# Altium PCB Kasli-DIOT.PCBDOC (part 19 of 23)
Units mm, origin at the board's own origin, x right, y up, seen from the top; angles counter-clockwise.
Board outline 222.9 x 100 mm, 10 copper layers (TopLayer, Layer 2, Layer 3, Layer 4, Layer 5, Layer 6, Layer 7, layer 8, Layer 9, BottomLayer), stack 1.564 mm thick; 977 components, 900 nets, 4676 pads, 2725 vias.
Unrouted connection lines stored in the file: 17.
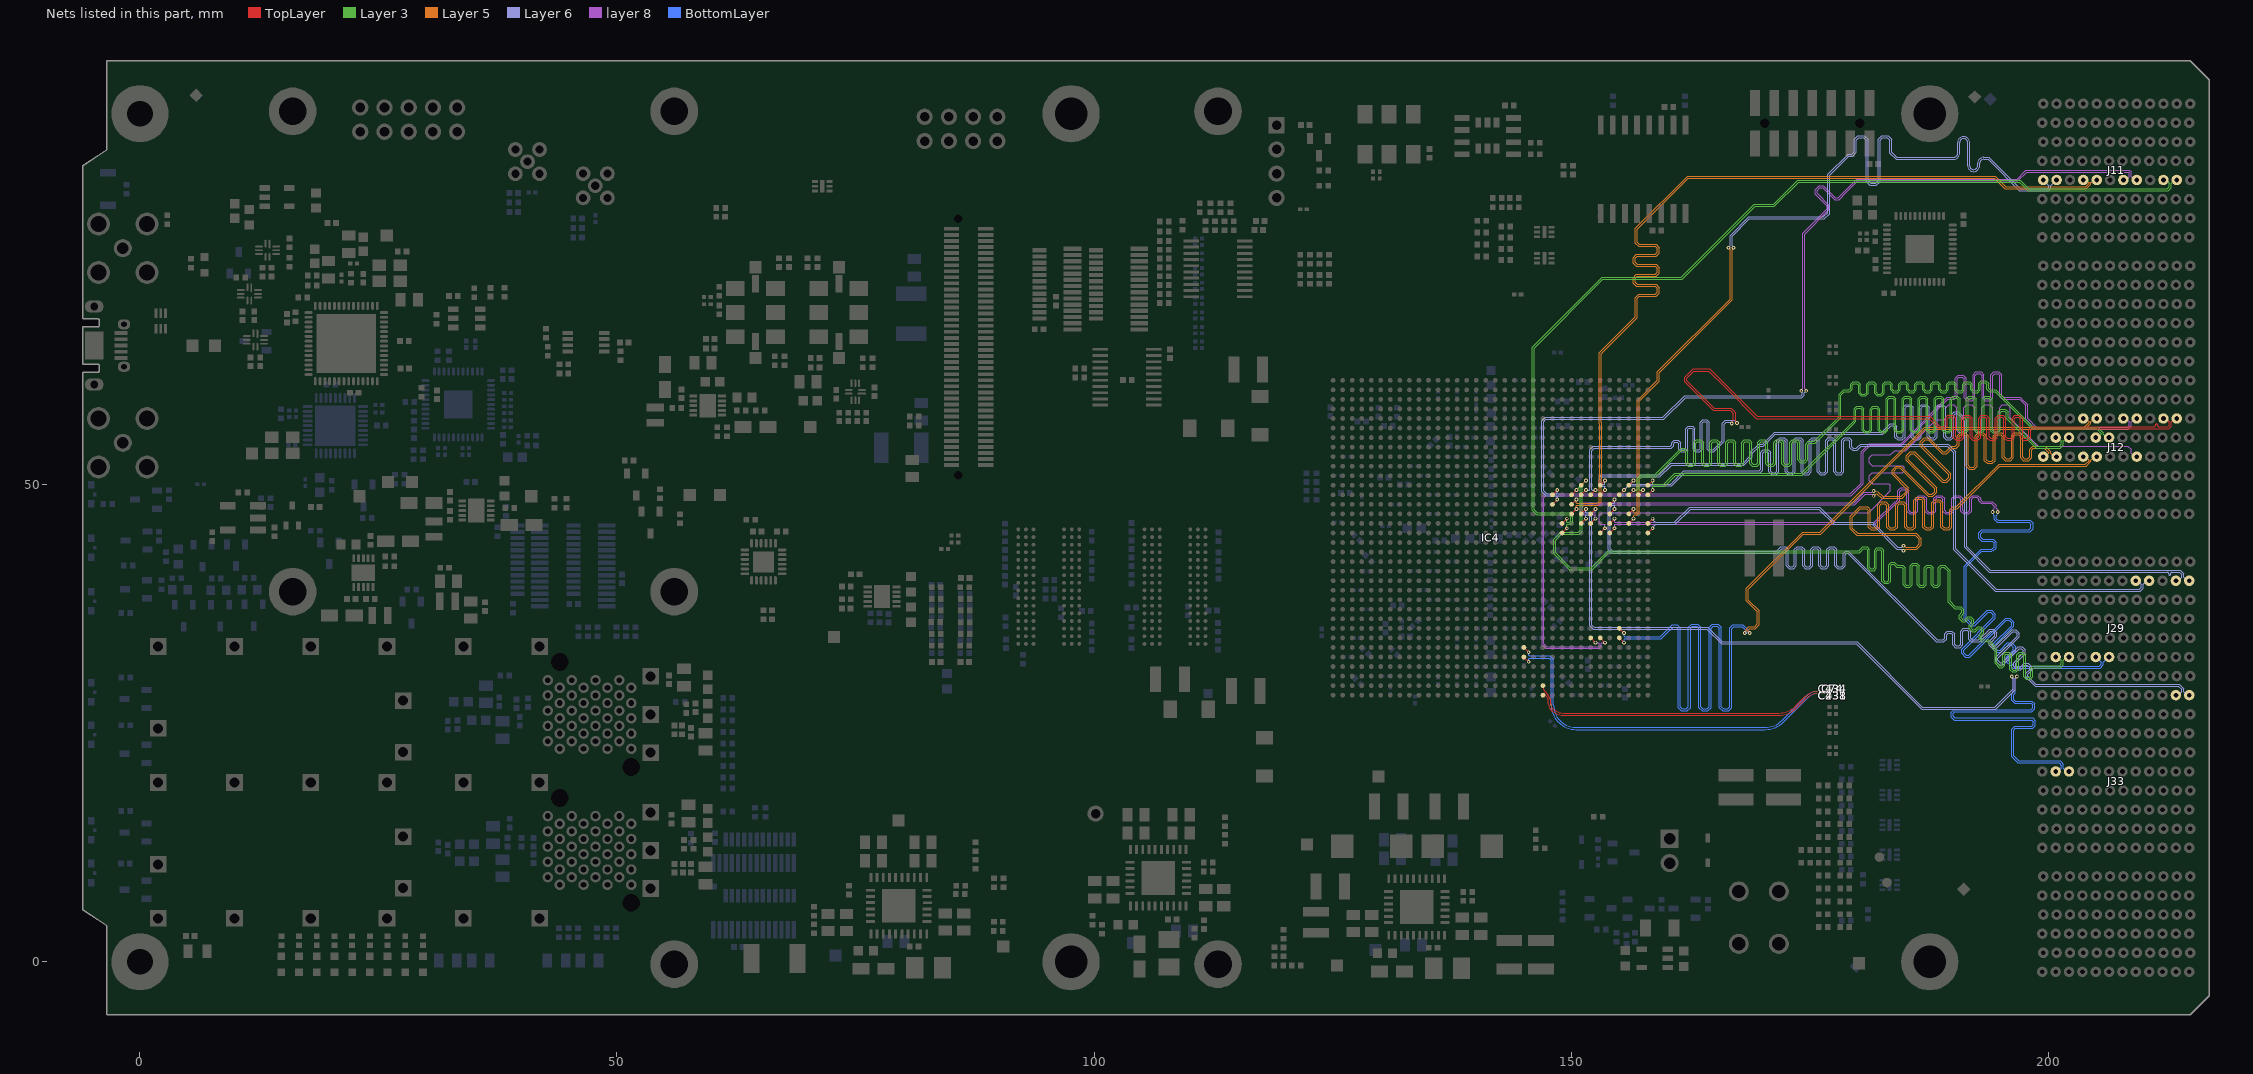
[diagram p25: the nets of this part, all layers, seen from the top]

## Via types
v1: diameter 0.4, hole 0.2, TopLayer to BottomLayer, tented both sides, 1723 vias
v2: diameter 0.5, hole 0.2, TopLayer to BottomLayer, tented both sides, 524 vias
v3: diameter 0.6, hole 0.3, TopLayer to BottomLayer, tented both sides, 172 vias
v4: diameter 0.6, hole 0.3, TopLayer to BottomLayer, 113 vias
v5: diameter 0.5, hole 0.2, TopLayer to BottomLayer, 107 vias
v6: diameter 0.4, hole 0.2, TopLayer to BottomLayer, 67 vias
v7: diameter 0.5, hole 0.25, TopLayer to BottomLayer, tented both sides, 12 vias
v8: diameter 0.8, hole 0.5, TopLayer to BottomLayer, tented both sides, 7 vias

## Nets (pads, with @x,y where several pads share a name; then routed paths per layer and width w, separated by ;. In a path a pad name is that pad's centre, name@x,y a point inside that pad or via, vN(x,y) a via of type N, cw(c..) or ccw(c..) an arc to the next point about the centre after c; other vN are vias at no path point) (continued)
SLOT4.LVDS_8_P: IC4.U29 J12.E4 | length 95.7
  TopLayer w0.095: IC4.U29@153.061,44.95 v1(153.561,45.45)
  layer 8 w0.075: v1(153.561,45.45) 153.561,45.805 153.517,45.849 153.123,45.849 152.961,46.011 152.961,46.808 153.226,47.073 181.198,47.073 183.477,49.351 183.477,49.843 183.477,49.94 183.292,50.124 181.571,50.124 181.269,50.427 181.269,50.963 181.571,51.265 184.758,51.265 184.943,51.45 184.943,51.818 184.758,52.002 181.571,52.002 181.269,52.305 181.269,52.841 181.571,53.143 183.473,53.143 183.755,53.425 183.921,53.592 185.066,53.592 188.296,56.822 189.003,56.822 189.1,56.822 189.284,57.006 189.284,58.07 189.587,58.373 190.122,58.373 190.425,58.07 190.425,55.713 190.609,55.529 190.978,55.529 191.162,55.713 191.162,58.07 191.465,58.373 192,58.373 192.303,58.07 192.303,55.713 192.487,55.529 192.856,55.529 193.04,55.713 193.04,58.07 193.343,58.373 193.878,58.373 194.181,58.07 194.181,55.713 194.365,55.529 194.734,55.529 194.918,55.713 194.918,58.07 195.221,58.373 195.756,58.373 196.059,58.07 196.059,56.98 197.511,55.528 198.981,54.057 208.365,54.057 208.701,53.721 208.701,53.311 209.062,52.95 J12.E4@209.3,52.95
SLOT4.LVDS_9_N: IC4.T34 J12.I4 | length 94.1
  TopLayer w0.095: IC4.T34@158.061,45.95 v1(158.561,46.45)
  Layer 5 w0.08: v1(184.861,43.61) 184.901,43.61 185.061,43.45 186.168,43.45 186.519,43.8 186.519,44.286 186.108,44.697 179.948,44.697 179.274,45.371 179.274,46.711 180.245,47.682 180.786,47.682 181.08,47.682 181.387,47.375 181.387,45.66 181.572,45.474 181.943,45.474 182.129,45.66 182.129,47.91 182.435,48.217 182.978,48.217 183.285,47.91 183.285,45.66 183.47,45.474 183.841,45.474 184.027,45.66 184.027,47.91 184.333,48.217 184.876,48.217 185.183,47.91 185.183,45.66 185.368,45.474 185.739,45.474 185.925,45.66 185.925,48.364 186.231,48.671 186.774,48.671 187.081,48.364 187.081,45.66 187.266,45.474 187.637,45.474 187.823,45.66 187.823,48.106 188.129,48.413 188.672,48.413 188.979,48.106 188.979,45.66 189.164,45.474 189.535,45.474 189.721,45.66 189.721,47.375 190.027,47.682 190.214,47.682 190.4,47.682 194.877,52.159 203.922,52.159 204.296,52.533 204.296,52.599 203.945,52.95 J12.I4@203.7,52.95
  Layer 6 w0.08: v1(158.561,46.45) 158.561,46.363 158.742,46.183 158.742,46.176 158.861,46.057 160.839,46.057 162.439,47.657 176.055,47.657 177.655,46.057 181.639,46.057 184.246,43.45 184.654,43.45 184.814,43.61 v1(184.861,43.61)
SLOT4.LVDS_9_P: IC4.U34 J12.H4 | length 94.5
  TopLayer w0.095: IC4.U34@158.061,44.95 v1(158.561,45.45)
  Layer 5 w0.08: v1(184.861,43.083) 184.901,43.083 185.061,43.243 186.254,43.243 186.726,43.715 186.726,44.371 186.193,44.904 180.034,44.904 179.481,45.457 179.481,46.625 180.33,47.475 180.786,47.475 180.994,47.475 181.18,47.29 181.18,45.574 181.486,45.267 182.029,45.267 182.336,45.574 182.336,47.825 182.521,48.01 182.892,48.01 183.078,47.825 183.078,45.574 183.384,45.267 183.927,45.267 184.234,45.574 184.234,47.825 184.419,48.01 184.79,48.01 184.976,47.825 184.976,45.574 185.282,45.267 185.825,45.267 186.132,45.574 186.132,48.278 186.317,48.464 186.688,48.464 186.874,48.278 186.874,45.574 187.18,45.267 187.723,45.267 188.03,45.574 188.03,48.02 188.215,48.206 188.586,48.206 188.772,48.02 188.772,45.574 189.078,45.267 189.621,45.267 189.928,45.574 189.928,47.29 190.113,47.475 190.214,47.475 190.486,47.475 194.963,51.952 204.008,51.952 204.503,52.447 204.503,52.599 204.854,52.95 J12.H4@205.1,52.95
  Layer 6 w0.08: v1(158.561,45.45) 158.561,45.537 158.742,45.717 158.742,45.731 158.861,45.85 160.925,45.85 162.525,47.45 175.969,47.45 177.569,45.85 181.554,45.85 184.161,43.243 184.654,43.243 184.814,43.083 v1(184.861,43.083)
SLOT4.LVDS_10_N: IC4.R28 J12.L4 | length 99.9
  TopLayer w0.095: IC4.R28@152.061,46.95 v1(152.561,47.45)
  Layer 5 w0.08: v1(181.724,48.845) 181.974,49.075 182.04,49.075 182.571,48.597 184.708,48.597 185.208,49.097 185.34,49.229 185.34,49.698 183.869,51.168 183.869,51.466 184.167,51.764 184.465,51.764 187.436,48.792 187.905,48.792 188.324,49.211 188.324,49.681 185.353,52.652 185.353,52.949 185.65,53.247 185.948,53.247 188.919,50.276 189.388,50.276 189.807,50.695 189.807,51.164 186.836,54.135 186.836,54.433 187.134,54.731 187.432,54.731 188.902,53.26 189.371,53.26 189.961,53.85 190.192,53.85 190.379,53.85 190.685,54.157 190.685,55.071 190.871,55.256 191.242,55.256 191.427,55.071 191.427,51.949 191.734,51.642 192.277,51.642 192.583,51.949 192.583,55.071 192.769,55.256 193.14,55.256 193.325,55.071 193.325,52.547 193.632,52.24 194.175,52.24 194.481,52.547 194.481,55.071 194.667,55.256 195.038,55.256 195.223,55.071 195.223,52.845 195.53,52.539 196.073,52.539 196.379,52.845 196.379,55.071 196.565,55.256 196.936,55.256 197.121,55.071 197.121,52.845 197.428,52.539 197.971,52.539 198.277,52.845 198.277,53.665 198.463,53.85 198.669,53.85 199.614,53.85 200.096,53.368 200.096,53.301 199.745,52.95 J12.L4@199.5,52.95
  layer 8 w0.075: v1(152.561,47.45) 152.561,47.095 152.517,47.051 151.325,47.051 151.158,47.218 151.158,47.668 151.39,47.9 179.746,47.9 180.84,48.994 181.518,48.994 181.667,48.845 v1(181.724,48.845)
SLOT4.LVDS_10_P: IC4.T28 J12.K4 | length 100.8
  TopLayer w0.095: IC4.T28@152.061,45.95 v1(152.561,46.45)
  Layer 5 w0.08: v1(181.724,49.345) 182.126,49.282 182.657,48.804 182.723,48.804 184.622,48.804 185.061,49.243 185.133,49.314 185.133,49.612 183.662,51.082 183.662,51.552 184.081,51.971 184.55,51.971 187.521,48.999 187.819,48.999 188.117,49.297 188.117,49.595 185.146,52.566 185.146,53.035 185.565,53.454 186.034,53.454 189.005,50.483 189.303,50.483 189.6,50.781 189.6,51.078 186.629,54.049 186.629,54.519 187.048,54.938 187.517,54.938 188.988,53.467 189.285,53.467 189.815,53.996 189.875,54.057 190.192,54.057 190.293,54.057 190.478,54.243 190.478,55.156 190.785,55.463 191.328,55.463 191.634,55.156 191.634,52.035 191.82,51.849 192.191,51.849 192.376,52.035 192.376,55.156 192.683,55.463 193.226,55.463 193.532,55.156 193.532,52.632 193.718,52.447 194.089,52.447 194.274,52.632 194.274,55.156 194.581,55.463 195.124,55.463 195.43,55.156 195.43,52.931 195.616,52.746 195.987,52.746 196.172,52.931 196.172,55.156 196.479,55.463 197.022,55.463 197.328,55.156 197.328,52.931 197.514,52.746 197.885,52.746 198.07,52.931 198.07,53.75 198.377,54.057 198.669,54.057 199.7,54.057 200.303,53.453 200.303,53.301 200.654,52.95 J12.K4@200.9,52.95
  layer 8 w0.075: v1(152.561,46.45) 152.561,46.805 152.517,46.849 151.241,46.849 150.956,47.134 150.956,47.752 151.306,48.102 179.662,48.102 180.756,49.196 181.518,49.196 181.667,49.345 v1(181.724,49.345)
SLOT4.LVDS_11_N: IC4.T25 J11.C4 | length 99
  TopLayer w0.095: IC4.T25@149.061,45.95 v1(149.561,46.45)
  Layer 3 w0.075: v1(149.561,46.45) 149.561,46.095 149.605,46.051 149.866,46.051 149.995,46.179 149.995,46.601 149.745,46.85 146.391,46.85 146.133,47.108 145.931,47.31 145.931,64.416 153.264,71.75 161.575,71.75 169.213,79.388 171.226,79.388 171.285,79.447 173.767,81.929 197.082,81.929 197.561,81.45 197.961,81.05 212.504,81.05 212.699,81.245 212.699,81.589 212.338,81.95 J11.C4@212.1,81.95
SLOT4.LVDS_11_P: IC4.U25 J11.B4 | length 99.3
  TopLayer w0.095: IC4.U25@149.061,44.95 v1(149.561,45.45)
  Layer 3 w0.075: v1(149.561,45.45) 149.561,45.805 149.605,45.849 149.95,45.849 150.197,46.096 150.197,46.685 149.829,47.052 146.474,47.052 146.133,47.394 146.133,64.333 153.348,71.548 161.659,71.548 169.297,79.186 171.31,79.186 171.369,79.245 173.85,81.727 196.998,81.727 197.347,81.379 197.877,80.848 212.587,80.848 212.901,81.161 212.901,81.589 213.262,81.95 J11.B4@213.5,81.95
SLOT4.LVDS_12_N: IC4.N24 J11.F4 | length 97.3
  TopLayer w0.095: IC4.N24@148.061,48.95 v1(148.561,49.45)
  Layer 6 w0.08: v1(148.561,49.45) 148.561,49.1 148.514,49.054 147.438,49.054 147.135,49.357 147.135,56.624 147.361,56.85 159.711,56.85 162.011,59.15 174.206,59.15 174.468,59.412 174.468,59.63 174.661,59.823 v1(174.661,59.85)
  layer 8 w0.075: v1(174.661,59.85) 174.661,59.894 174.499,60.056 174.499,76.288 176.911,78.7 177.039,78.828 177.039,79.291 175.786,80.543 175.786,80.839 176.082,81.135 176.378,81.135 177.631,79.883 178.094,79.883 178.855,80.644 180.06,81.849 196.842,81.849 196.902,81.908 197.774,82.781 208.452,82.781 208.499,82.734 208.499,82.311 208.138,81.95 J11.F4@207.9,81.95
SLOT4.LVDS_12_P: IC4.P24 J11.E4 | length 98.3
  TopLayer w0.095: IC4.P24@148.061,47.95 v1(148.561,48.45)
  Layer 6 w0.08: v1(148.561,48.45) 148.561,48.8 148.514,48.847 147.353,48.847 146.928,49.271 146.928,56.71 147.275,57.057 159.625,57.057 161.925,59.357 174.12,59.357 174.261,59.498 174.261,59.643 174.134,59.77 v1(174.134,59.85)
  layer 8 w0.075: v1(174.134,59.85) 174.134,59.894 174.296,60.056 174.296,76.371 176.768,78.843 176.837,78.911 176.837,79.207 175.584,80.46 175.584,80.923 175.998,81.337 176.462,81.337 177.714,80.085 178.01,80.085 178.712,80.787 179.976,82.051 196.759,82.051 197.691,82.983 208.536,82.983 208.701,82.818 208.701,82.311 209.062,81.95 J11.E4@209.3,81.95
SLOT4.LVDS_13_N: IC4.P26 J11.I4 | length 97.9
  TopLayer w0.095: IC4.P26@150.061,47.95 v1(150.561,48.45)
  Layer 5 w0.08: v1(150.561,48.45) 150.561,48.1 150.608,48.054 152.765,48.054 152.961,48.25 152.961,50.543 152.954,50.55 152.949,56.42 152.949,60.074 152.954,60.079 152.954,63.811 152.977,63.834 156.754,67.611 156.754,68.188 156.754,69.622 157.086,69.953 158.851,69.953 159.062,70.164 159.062,70.585 158.851,70.795 156.838,70.795 156.506,71.127 156.506,71.72 156.838,72.051 158.851,72.051 159.062,72.262 159.062,72.683 158.851,72.893 156.838,72.893 156.506,73.225 156.506,73.818 156.838,74.149 158.851,74.149 159.062,74.36 159.062,74.781 158.851,74.991 157.086,74.991 156.754,75.323 156.754,75.51 156.754,76.868 162.213,82.326 194.472,82.326 195.565,81.233 203.93,81.233 204.296,81.599 204.296,81.665 204.249,81.712 204.214,81.712 203.976,81.95 J11.I4@203.7,81.95
SLOT4.LVDS_13_P: IC4.R26 J11.H4 | length 98.2
  TopLayer w0.095: IC4.R26@150.061,46.95 v1(150.561,47.45)
  Layer 5 w0.08: v1(150.561,47.45) 150.561,47.8 150.608,47.847 152.85,47.847 153.168,48.164 153.168,50.603 153.161,56.363 cw(c153.496,56.421) 153.161,56.479 153.161,63.725 153.184,63.748 156.961,67.525 156.961,68.188 156.961,69.536 157.171,69.746 158.937,69.746 159.269,70.078 159.269,70.671 158.937,71.002 156.923,71.002 156.713,71.213 156.713,71.634 156.923,71.844 158.937,71.844 159.269,72.176 159.269,72.769 158.937,73.1 156.923,73.1 156.713,73.311 156.713,73.732 156.923,73.942 158.937,73.942 159.269,74.274 159.269,74.867 158.937,75.198 157.171,75.198 156.961,75.409 156.961,75.51 156.961,76.782 162.298,82.119 194.386,82.119 195.479,81.026 204.016,81.026 204.503,81.513 204.503,81.665 204.55,81.712 204.586,81.712 204.824,81.95 J11.H4@205.1,81.95
SLOT4.LVDS_14_N: IC4.R32 J11.L4 | length 94.5
  TopLayer w0.095: IC4.R32@156.061,46.95 v1(156.561,47.45)
  Layer 5 w0.08: v1(156.561,47.45) 156.561,47.1 156.608,47.054 156.854,47.054 156.954,47.153 156.954,58.836 159.054,60.936 159.054,61.843 166.67,69.459 166.67,74.643 166.51,74.803 v1(166.51,74.85)
  Layer 6 w0.08: v1(166.51,74.85) 166.51,74.897 166.67,75.057 166.67,76.127 168.618,78.075 176.461,78.075 176.909,78.523 176.909,82.537 179.034,84.663 179.322,84.663 179.423,84.663 179.684,84.923 179.684,86.212 180.065,86.594 180.758,86.594 181.14,86.212 181.14,81.866 181.4,81.606 181.921,81.606 182.182,81.866 182.182,86.212 182.563,86.594 183.256,86.594 183.638,86.212 183.638,84.833 184.154,84.316 185.775,84.316 189.08,84.316 190.103,84.316 ccw(c190.103,84.737) 190.524,84.737 190.524,85.876 cw(c191.152,85.876) 191.78,85.876 191.78,83.466 ccw(c192.201,83.466) 192.622,83.466 192.622,83.688 cw(c193.25,83.688) 193.25,84.316 193.799,84.316 193.918,84.197 195.288,82.827 197.065,81.05 199.986,81.05 200.096,81.161 200.096,81.354 J11.L4@199.5,81.95
SLOT4.LVDS_14_P: IC4.T32 J11.K4 | length 94.8
  TopLayer w0.095: IC4.T32@156.061,45.95 v1(156.561,46.45)
  Layer 5 w0.08: v1(156.561,46.45) 156.561,46.8 156.608,46.847 156.94,46.847 157.161,47.068 157.161,58.75 159.261,60.85 159.261,61.757 166.877,69.374 166.877,74.643 167.037,74.803 v1(167.037,74.85)
  Layer 6 w0.08: v1(167.037,74.85) 167.037,74.897 166.877,75.057 166.877,76.041 168.704,77.868 176.547,77.868 177.116,78.437 177.116,82.451 179.12,84.456 179.322,84.456 179.509,84.456 179.891,84.837 179.891,86.127 180.151,86.387 180.672,86.387 180.933,86.127 180.933,81.78 181.314,81.399 182.007,81.399 182.389,81.78 182.389,86.127 182.649,86.387 183.17,86.387 183.431,86.127 183.431,84.747 184.068,84.109 185.775,84.109 189.08,84.109 190.103,84.109 ccw(c190.103,84.737) 190.731,84.737 190.731,85.876 cw(c191.152,85.876) 191.573,85.876 191.573,83.466 ccw(c192.201,83.466) 192.829,83.466 192.829,83.688 cw(c193.25,83.688) 193.25,84.109 193.713,84.109 193.918,83.904 196.979,80.843 200.071,80.843 200.303,81.075 200.303,81.354 J11.K4@200.9,81.95
SLOT4.LVDS_15_N: IC4.R27 J33.K5 | length 98.9
  TopLayer w0.095: IC4.R27@151.061,46.95 v1(151.561,47.45)
  Layer 6 w0.08: v1(151.561,47.45) 151.561,47.1 151.608,47.054 151.95,47.054 152.194,46.81 152.194,35.298 152.409,35.083 164.321,35.083 165.875,33.529 179.982,33.529 186.836,26.675 194.437,26.675 196.361,28.599 196.361,29.703 196.201,29.863 v1(196.201,29.922)
  BottomLayer w0.095: v1(196.201,29.922) 196.201,29.867 196.354,29.714 196.354,28.231 196.201,28.078 196.201,27.734 196.201,27.393 196.495,27.099 198.216,27.099 198.38,26.935 198.38,26.606 198.216,26.442 190.154,26.442 189.859,26.148 189.859,25.635 190.154,25.341 198.296,25.341 198.461,25.177 198.461,24.848 198.296,24.684 196.495,24.684 196.201,24.39 196.201,23.306 196.201,21.496 196.845,20.852 201.164,20.852 201.389,20.627 201.389,20.307 201.032,19.95 J33.K5@200.8,19.95
SLOT4.LVDS_15_P: IC4.T27 J33.J5 | length 99.2
  TopLayer w0.095: IC4.T27@151.061,45.95 v1(151.561,46.45)
  Layer 6 w0.08: v1(151.561,46.45) 151.561,46.8 151.608,46.847 151.865,46.847 151.987,46.724 151.987,35.212 152.323,34.876 164.235,34.876 165.789,33.322 179.896,33.322 186.75,26.468 194.523,26.468 196.568,28.513 196.568,29.703 196.728,29.863 v1(196.728,29.922)
  BottomLayer w0.095: v1(196.728,29.922) 196.728,29.867 196.576,29.714 196.576,28.139 196.423,27.987 196.423,27.734 196.423,27.485 196.587,27.321 198.308,27.321 198.602,27.027 198.602,26.514 198.308,26.22 190.246,26.22 190.081,26.056 190.081,25.727 190.246,25.563 198.388,25.563 198.683,25.269 198.683,24.756 198.388,24.462 196.587,24.462 196.423,24.298 196.423,23.306 196.423,21.588 196.937,21.074 201.256,21.074 201.611,20.719 201.611,20.307 201.968,19.95 J33.J5@202.2,19.95
SLOT4_MGT.MGT_Rx_N: C438.2 IC4.AK21 | length 40.3
  TopLayer w0.095: IC4.AK21@145.061,31.95 v1(145.561,31.45)
  BottomLayer w0.095: v1(145.561,31.45) 145.561,31.783 145.617,31.839 147.702,31.839 147.936,31.605 147.936,26.838 ccw(c150.294,26.838) 148.626,25.171 148.691,25.106 ccw(c150.516,26.93) 148.692,25.105 ccw(c150.516,26.93) 150.516,24.35 170.343,24.35 ccw(c170.343,27.109) 172.294,25.158 174.711,27.575 cw(c176.073,26.213) 176.073,28.139 176.802,28.139 cw(c176.802,28.016) 176.889,28.103 cw(c176.841,28.055) 176.909,28.055 ccw(c176.976,28.055) 176.928,28.008 177.043,27.893 ccw(c177.086,27.935) C438.2@177.086,27.875
SLOT4_MGT.MGT_Rx_P: C434.2 IC4.AJ21 | length 40.3
  TopLayer w0.095: IC4.AJ21@145.061,32.95 v1(145.561,32.45)
  BottomLayer w0.095: v1(145.561,32.45) 145.561,32.117 145.617,32.061 147.794,32.061 148.158,31.697 148.158,26.93 ccw(c150.516,26.93) 148.848,25.263 ccw(c150.516,26.93) 150.516,24.572 170.342,24.572 ccw(c170.342,27.112) 172.138,25.316 174.556,27.734 cw(c176.07,26.22) 176.07,28.361 176.802,28.361 ccw(c176.802,28.484) 176.889,28.397 ccw(c176.841,28.445) 176.909,28.445 cw(c176.976,28.445) 176.928,28.492 177.043,28.607 cw(c177.086,28.565) C434.2@177.086,28.625
SLOT4_MGT.MGT_Tx_N: C231.1 IC4.AP23 | length 32.4
  TopLayer w0.095: IC4.AP23@147.061,27.95 ccw(c146.875,28.136) 147.138,28.136 cw(c147.113,28.044) IC4.AP23@147.16,28.127 ; IC4.AP23@147.16,28.127 cw(c147.061,27.95) 147.245,28.035 ccw(c147.53,28.172) 147.306,27.949 147.406,27.848 cw(c147.339,27.781) 147.432,27.802 ccw(c148.061,27.95) 147.608,27.489 cw(c147.541,27.421) 147.636,27.421 147.636,27.039 ccw(c148.547,27.039) 147.903,26.394 147.905,26.392 ccw(c149.206,27.693) 149.206,25.853 149.569,25.853 171.771,25.853 ccw(c171.771,28.612) 173.722,26.661 174.611,27.55 cw(c176.033,26.128) 176.033,28.139 176.802,28.139 cw(c176.802,28.016) 176.889,28.103 cw(c176.841,28.055) 176.909,28.055 ccw(c176.976,28.055) C231.1@176.928,28.008 ; C231.1@176.928,28.008 177.043,27.893 ccw(c177.086,27.935) C231.1@177.086,27.875
SLOT4_MGT.MGT_Tx_P: C74.1 IC4.AN23 | length 32.7
  TopLayer w0.095: IC4.AN23@147.061,28.95 ccw(c148.129,28.95) 147.253,28.339 ccw(c147.33,28.394) 147.28,28.313 cw(c147.061,27.95) 147.445,28.131 ccw(c147.53,28.172) 147.463,28.106 147.563,28.006 cw(c147.339,27.781) 147.648,27.854 ccw(c148.061,27.95) 147.764,27.647 cw(c147.541,27.421) 147.858,27.422 147.858,27.04 ccw(c148.551,27.04) 148.061,26.55 ccw(c149.208,27.697) 149.208,26.075 171.77,26.075 ccw(c171.77,28.615) 173.566,26.819 174.456,27.709 cw(c176.03,26.135) 176.03,28.361 176.802,28.361 ccw(c176.802,28.484) 176.889,28.397 ccw(c176.841,28.445) 176.909,28.445 cw(c176.976,28.445) 176.928,28.492 177.043,28.607 cw(c177.086,28.565) C74.1@177.086,28.625
SLOT5.LVDS_0_N: IC4.T30 J29.H3 | length 115.7
  TopLayer w0.095: IC4.T30@154.061,45.95 v1(154.561,46.45)
  layer 8 w0.075: v1(154.561,46.45) 154.561,46.095 154.605,46.051 181.776,46.051 183.975,48.25 183.989,48.25 184.086,48.25 184.27,48.434 184.27,49.377 184.573,49.68 185.108,49.68 185.411,49.377 185.411,47.326 185.595,47.142 185.964,47.142 186.148,47.326 186.148,48.57 186.451,48.873 186.986,48.873 187.289,48.57 187.289,47.326 187.473,47.142 187.842,47.142 188.026,47.326 188.026,48.57 188.329,48.873 188.864,48.873 189.167,48.57 189.167,47.326 189.351,47.142 189.72,47.142 189.904,47.326 189.904,48.57 190.207,48.873 190.742,48.873 191.045,48.57 191.045,47.326 191.229,47.142 191.598,47.142 191.782,47.326 191.782,48.57 192.085,48.873 192.62,48.873 192.923,48.57 192.923,48.434 193.107,48.25 193.331,48.25 194.145,48.25 194.563,47.832 194.563,47.546 194.736,47.373 194.736,47.161 v1(194.726,47.15)
  BottomLayer w0.095: v1(194.726,47.15) 194.726,47.108 194.741,47.093 194.743,47.093 cw(c194.199,47.15) 194.573,46.751 194.573,46.577 194.573,46.465 194.762,46.276 198.116,46.276 198.436,45.956 198.436,45.394 198.116,45.075 193.152,45.075 192.962,44.885 192.962,44.507 193.152,44.318 194.254,44.318 194.573,43.998 194.573,43.586 194.573,43.372 194.271,43.07 ccw(c194.28,42.523) 194.121,43.047 193.071,43.047 191.422,41.397 191.422,35.989 191.881,35.53 191.961,35.45 192.229,35.45 193.631,36.852 194.082,36.852 194.48,36.454 194.48,36.003 191.155,32.678 191.155,32.411 191.423,32.143 191.691,32.143 195.553,36.005 196.005,36.005 196.402,35.608 196.402,35.156 194.432,33.185 194.432,32.918 194.699,32.65 194.967,32.65 195.75,33.434 196.202,33.434 196.599,33.036 196.599,32.584 195.847,31.832 195.847,31.564 196.18,31.231 196.41,31.001 205.384,31.001 205.589,31.206 205.589,31.394 205.033,31.95 J29.H3@205,31.95
SLOT5.LVDS_0_P: IC4.U30 J29.G3 | length 116.1
  TopLayer w0.095: IC4.U30@154.061,44.95 v1(154.561,45.45)
  layer 8 w0.075: v1(154.561,45.45) 154.561,45.805 154.605,45.849 181.86,45.849 183.989,47.978 184.059,48.048 184.169,48.048 184.472,48.351 184.472,49.294 184.656,49.478 185.025,49.478 185.209,49.294 185.209,47.243 185.512,46.94 186.047,46.94 186.35,47.243 186.35,48.487 186.534,48.671 186.903,48.671 187.087,48.487 187.087,47.243 187.39,46.94 187.925,46.94 188.228,47.243 188.228,48.487 188.412,48.671 188.781,48.671 188.965,48.487 188.965,47.243 189.268,46.94 189.803,46.94 190.106,47.243 190.106,48.487 190.29,48.671 190.659,48.671 190.843,48.487 190.843,47.243 191.146,46.94 191.681,46.94 191.984,47.243 191.984,48.487 192.168,48.671 192.537,48.671 192.721,48.487 192.721,48.351 193.024,48.048 193.331,48.048 194.061,48.048 194.361,47.748 194.361,47.513 194.211,47.363 194.211,47.162 v1(194.199,47.15)
  BottomLayer w0.095: v1(194.199,47.15) 194.199,47.108 194.181,47.089 ccw(c194.726,47.15) 194.351,46.751 194.351,46.577 194.351,46.373 194.67,46.054 198.024,46.054 198.214,45.864 198.214,45.486 198.024,45.297 193.06,45.297 192.74,44.977 192.74,44.415 193.06,44.096 194.162,44.096 194.351,43.906 194.351,43.586 194.351,43.464 194.172,43.284 ccw(c194.28,42.523) 194.091,43.269 192.98,43.269 191.2,41.489 191.2,35.897 191.724,35.373 191.869,35.228 192.321,35.228 193.723,36.63 193.99,36.63 194.258,36.363 194.258,36.095 190.933,32.77 190.933,32.319 191.331,31.921 191.783,31.921 195.645,35.783 195.913,35.783 196.18,35.516 196.18,35.248 194.21,33.277 194.21,32.826 194.607,32.428 195.059,32.428 195.842,33.212 196.11,33.212 196.377,32.944 196.377,32.676 195.625,31.924 195.625,31.472 196.023,31.075 196.318,30.779 205.476,30.779 205.811,31.114 205.811,31.394 206.366,31.95 J29.G3@206.4,31.95
SLOT5.LVDS_1_N: IC4.M27 J29.K3 | length 105.7
  TopLayer w0.095: IC4.M27@151.061,49.95 v1(151.561,50.45)
  Layer 3 w0.075: v1(151.561,50.45) 151.177,50.066 151.177,45.147 150.85,44.82 148.989,44.82 148.378,44.21 148.378,42.858 149.651,41.585 149.917,41.319 152.127,41.319 153.893,43.085 179.475,43.085 180.206,43.085 180.34,43.22 180.34,43.27 180.593,43.523 181.029,43.523 181.281,43.27 181.281,41.339 181.416,41.205 181.684,41.205 181.818,41.339 181.818,43.142 182.071,43.395 182.507,43.395 182.759,43.142 182.759,39.993 182.894,39.859 183.162,39.859 183.296,39.993 183.296,41.62 183.549,41.872 183.906,41.872 184.003,41.776 184.222,41.556 184.469,41.556 184.767,41.556 185.02,41.303 185.02,39.582 185.154,39.448 185.423,39.448 185.557,39.582 185.557,41.528 185.81,41.781 186.245,41.781 186.498,41.528 186.498,39.582 186.632,39.448 186.901,39.448 187.035,39.582 187.035,41.303 187.288,41.556 187.723,41.556 187.976,41.303 187.976,39.582 188.11,39.448 188.379,39.448 188.513,39.582 188.513,41.303 188.766,41.556 188.946,41.556 189.175,41.556 189.73,41.001 189.73,37.777 190.246,37.261 190.314,37.192 190.504,37.192 190.519,37.207 190.876,37.207 191.184,36.899 191.184,36.542 190.881,36.238 190.881,36.048 191.071,35.859 191.261,35.859 191.564,36.162 191.921,36.162 192.229,35.854 192.229,35.497 191.926,35.193 191.926,35.003 192.116,34.814 192.306,34.814 192.609,35.117 192.966,35.117 193.275,34.809 193.275,34.452 192.971,34.148 192.971,33.958 193.161,33.768 193.351,33.768 193.366,33.783 193.723,33.783 193.955,33.551 194.024,33.483 194.486,33.02 194.486,32.821 194.648,32.659 194.648,32.415 cw(c193.911,32.35) 194.648,32.285 194.648,31.363 194.729,31.282 194.961,31.05 195.026,31.05 195.123,31.05 195.257,31.184 195.257,32.172 195.51,32.425 195.946,32.425 196.198,32.172 196.198,30.719 196.332,30.585 196.601,30.585 196.735,30.719 196.735,32.172 196.988,32.425 197.424,32.425 197.676,32.172 197.676,29.941 197.81,29.807 198.079,29.807 198.213,29.941 198.213,30.797 198.466,31.05 199.181,31.05 201.225,31.05 201.399,31.224 201.399,31.589 201.038,31.95 J29.K3@200.8,31.95
SLOT5.LVDS_1_P: IC4.N26 J29.J3 | length 106.1
  TopLayer w0.095: IC4.N26@150.061,48.95 v1(150.561,49.45)
  Layer 3 w0.075: v1(150.561,49.45) 150.869,49.758 150.931,49.758 150.975,49.714 150.975,45.231 150.767,45.022 148.905,45.022 148.176,44.294 148.176,42.774 149.509,41.442 149.833,41.117 152.211,41.117 153.977,42.883 179.475,42.883 180.29,42.883 180.542,43.136 180.542,43.187 180.677,43.321 180.945,43.321 181.079,43.187 181.079,41.255 181.332,41.003 181.768,41.003 182.02,41.255 182.02,43.059 182.155,43.193 182.423,43.193 182.557,43.059 182.557,39.909 182.81,39.657 183.246,39.657 183.498,39.909 183.498,41.536 183.633,41.67 183.822,41.67 184.003,41.49 184.139,41.354 184.469,41.354 184.684,41.354 184.818,41.22 184.818,39.499 185.071,39.246 185.506,39.246 185.759,39.499 185.759,41.445 185.893,41.579 186.162,41.579 186.296,41.445 186.296,39.499 186.549,39.246 186.984,39.246 187.237,39.499 187.237,41.22 187.371,41.354 187.64,41.354 187.774,41.22 187.774,39.499 188.027,39.246 188.462,39.246 188.715,39.499 188.715,41.22 188.849,41.354 188.946,41.354 189.091,41.354 189.528,40.917 189.528,37.693 190.103,37.118 190.171,37.049 190.23,36.99 190.588,36.99 190.603,37.005 190.792,37.005 190.982,36.815 190.982,36.625 190.679,36.322 190.679,35.965 190.987,35.657 191.344,35.657 191.648,35.96 191.838,35.96 192.027,35.77 192.027,35.58 191.724,35.277 191.724,34.92 192.032,34.612 192.389,34.612 192.693,34.915 192.883,34.915 193.073,34.725 193.073,34.535 192.769,34.232 192.769,33.875 193.077,33.566 193.434,33.566 193.449,33.581 193.639,33.581 193.812,33.408 193.881,33.34 194.284,32.936 194.284,32.737 194.446,32.576 194.446,32.405 cw(c193.911,32.35) 194.446,32.295 194.446,31.28 194.877,30.848 195.026,30.848 195.207,30.848 195.459,31.101 195.459,32.088 195.593,32.223 195.862,32.223 195.996,32.088 195.996,30.636 196.249,30.383 196.685,30.383 196.937,30.636 196.937,32.088 197.071,32.223 197.34,32.223 197.474,32.088 197.474,29.858 197.727,29.605 198.163,29.605 198.415,29.858 198.415,30.714 198.549,30.848 199.181,30.848 201.308,30.848 201.601,31.14 201.601,31.589 201.962,31.95 J29.J3@202.2,31.95
SLOT5.LVDS_2_N: IC4.P30 J29.B1 | length 106.4
  TopLayer w0.095: IC4.P30@154.061,47.95 v1(154.561,48.45)
  Layer 6 w0.08: v1(154.561,48.45) 154.561,48.1 154.514,48.054 154.223,48.054 153.928,47.759 153.928,43.19 154.275,42.843 168.635,42.843 171.649,42.843 171.931,43.125 171.931,43.146 172.091,43.306 172.412,43.306 172.573,43.146 172.573,41.507 172.855,41.226 173.347,41.226 173.629,41.507 173.629,43.146 173.789,43.306 174.11,43.306 174.271,43.146 174.271,41.507 174.553,41.226 175.045,41.226 175.327,41.507 175.327,43.146 175.487,43.306 175.808,43.306 175.969,43.146 175.969,41.507 176.251,41.226 176.743,41.226 177.025,41.507 177.025,43.146 177.185,43.306 177.506,43.306 177.667,43.146 177.667,41.507 177.949,41.226 178.441,41.226 178.723,41.507 178.723,42.683 178.883,42.843 178.975,42.843 178.984,42.834 188.289,33.529 188.891,33.529 189.077,33.529 189.359,33.811 189.359,34.282 189.519,34.443 189.84,34.443 190.001,34.282 190.001,33.212 190.283,32.93 190.775,32.93 191.057,33.212 191.057,34.576 191.217,34.737 191.538,34.737 191.699,34.576 191.699,33.811 191.981,33.529 192.307,33.529 192.5,33.529 192.849,33.529 193.972,34.652 194.199,34.652 194.426,34.425 194.426,34.198 193.826,33.597 193.826,33.199 194.174,32.851 194.572,32.851 196.316,34.595 196.543,34.595 196.77,34.368 196.77,34.141 194.54,31.91 194.54,31.512 194.888,31.164 195.287,31.164 196.964,32.841 197.191,32.841 197.418,32.614 197.418,32.387 196.396,31.365 196.396,30.967 196.744,30.619 197.143,30.619 197.615,31.091 197.842,31.091 198.069,30.864 198.069,30.637 197.674,30.242 197.674,29.844 197.78,29.738 197.936,29.582 198.007,29.511 198.637,28.881 213.665,28.881 213.996,28.55 213.996,28.453 213.996,28.301 213.645,27.95 J29.B1@213.4,27.95
SLOT5.LVDS_2_P: IC4.R30 J29.A1 | length 106
  TopLayer w0.095: IC4.R30@154.061,46.95 v1(154.561,47.45)
  Layer 6 w0.08: v1(154.561,47.45) 154.561,47.8 154.514,47.847 154.309,47.847 154.135,47.673 154.135,43.276 154.361,43.05 168.635,43.05 171.563,43.05 171.724,43.21 171.724,43.231 172.006,43.513 172.498,43.513 172.78,43.231 172.78,41.593 172.94,41.433 173.261,41.433 173.422,41.593 173.422,43.231 173.704,43.513 174.196,43.513 174.478,43.231 174.478,41.593 174.638,41.433 174.959,41.433 175.12,41.593 175.12,43.231 175.402,43.513 175.894,43.513 176.176,43.231 176.176,41.593 176.336,41.433 176.657,41.433 176.818,41.593 176.818,43.231 177.1,43.513 177.592,43.513 177.874,43.231 177.874,41.593 178.034,41.433 178.355,41.433 178.516,41.593 178.516,42.768 178.798,43.05 178.984,43.05 179.061,43.05 188.375,33.736 188.891,33.736 188.991,33.736 189.152,33.896 189.152,34.368 189.434,34.65 189.926,34.65 190.208,34.368 190.208,33.297 190.368,33.137 190.689,33.137 190.85,33.297 190.85,34.662 191.132,34.944 191.624,34.944 191.906,34.662 191.906,33.896 192.066,33.736 192.307,33.736 192.707,33.736 192.763,33.736 193.886,34.859 194.285,34.859 194.633,34.51 194.633,34.112 194.033,33.512 194.033,33.285 194.26,33.058 194.487,33.058 196.231,34.802 196.629,34.802 196.977,34.454 196.977,34.055 194.747,31.825 194.747,31.598 194.974,31.371 195.201,31.371 196.878,33.048 197.276,33.048 197.625,32.7 197.625,32.301 196.603,31.28 196.603,31.053 196.83,30.826 197.057,30.826 197.529,31.298 197.928,31.298 198.276,30.949 198.276,30.551 197.881,30.157 197.881,29.93 197.977,29.834 198.082,29.729 198.154,29.657 198.723,29.088 213.751,29.088 214.203,28.636 214.203,28.368 214.203,28.301 214.554,27.95 J29.A1@214.8,27.95
SLOT5.LVDS_3_N: IC4.M29 J29.B7 | length 104.7
  TopLayer w0.095: IC4.M29@153.061,49.95 v1(153.561,50.45)
  Layer 6 w0.08: v1(153.561,50.45) 153.561,50.1 153.514,50.054 153.262,50.054 153.161,50.154 153.161,50.679 153.332,50.85 159.322,50.85 160.536,52.064 168.116,52.064 169.001,52.949 169.001,53.31 169.758,54.067 170.167,54.067 171.425,55.325 182.679,55.325 182.895,55.542 183.57,56.216 183.797,56.216 183.957,56.055 183.957,55.001 184.239,54.72 184.731,54.72 185.013,55.001 185.013,58.05 185.174,58.21 185.495,58.21 185.655,58.05 185.655,55.001 185.937,54.72 186.429,54.72 186.711,55.001 186.711,58.05 186.872,58.21 187.193,58.21 187.353,58.05 187.353,55.001 187.635,54.72 188.127,54.72 188.409,55.001 188.409,58.05 188.57,58.21 188.891,58.21 189.051,58.05 189.051,55.001 189.333,54.72 189.825,54.72 190.107,55.001 190.107,57.299 190.268,57.459 190.495,57.459 190.681,57.273 191.274,56.679 191.274,54.95 191.274,43.43 193.854,40.85 212.245,40.85 212.515,40.85 cw(c212.515,40.735) 212.63,40.735 212.63,40.657 ccw(c212.745,40.657) 212.745,40.542 ccw(c212.745,40.657) 212.86,40.657 212.86,40.735 cw(c212.975,40.735) 212.975,40.85 213.479,40.85 213.754,40.85 213.996,40.608 213.996,40.301 213.645,39.95 J29.B7@213.4,39.95
SLOT5.LVDS_3_P: IC4.N29 J29.A7 | length 105.3
  TopLayer w0.095: IC4.N29@153.061,48.95 v1(153.561,49.45)
  Layer 6 w0.08: v1(153.561,49.45) 153.561,49.8 153.514,49.847 153.176,49.847 152.954,50.068 152.954,50.765 153.246,51.057 159.236,51.057 160.45,52.271 168.03,52.271 168.794,53.035 168.794,53.395 169.672,54.274 170.081,54.274 171.339,55.532 182.593,55.532 182.895,55.834 183.484,56.423 183.882,56.423 184.164,56.141 184.164,55.087 184.325,54.927 184.646,54.927 184.806,55.087 184.806,58.136 185.088,58.417 185.58,58.417 185.862,58.136 185.862,55.087 186.023,54.927 186.344,54.927 186.504,55.087 186.504,58.136 186.786,58.417 187.278,58.417 187.56,58.136 187.56,55.087 187.721,54.927 188.042,54.927 188.202,55.087 188.202,58.136 188.484,58.417 188.976,58.417 189.258,58.136 189.258,55.087 189.419,54.927 189.74,54.927 189.9,55.087 189.9,57.384 190.182,57.666 190.58,57.666 190.681,57.565 191.481,56.765 191.481,54.864 191.481,43.515 193.94,41.057 212.245,41.057 213.84,41.057 214.203,40.694 214.203,40.301 214.555,39.95 J29.A7@214.8,39.95
SLOT5.LVDS_4_N: IC4.M32 J29.E7 | length 104.6
  TopLayer w0.095: IC4.M32@156.061,49.95 v1(156.561,50.45)
  Layer 6 w0.08: v1(156.561,50.45) 156.307,50.196 156.307,50.13 156.354,50.083 160.45,50.083 161.817,51.45 169.628,51.45 169.729,51.45 169.889,51.61 169.889,53.405 170.171,53.687 170.664,53.687 170.945,53.405 170.945,51.428 171.106,51.268 171.427,51.268 171.587,51.428 171.587,54.663 171.869,54.945 172.362,54.945 172.643,54.663 172.643,51.428 172.804,51.268 173.125,51.268 173.285,51.428 173.285,54.663 173.567,54.945 174.06,54.945 174.341,54.663 174.341,51.428 174.502,51.268 174.823,51.268 174.983,51.428 174.983,54.663 175.265,54.945 175.758,54.945 176.039,54.663 176.039,51.428 176.2,51.268 176.521,51.268 176.681,51.428 176.681,54.663 176.963,54.945 177.456,54.945 177.737,54.663 177.737,51.428 177.898,51.268 178.219,51.268 178.379,51.428 178.379,54.663 178.661,54.945 179.154,54.945 179.435,54.663 179.435,53.977 179.596,53.816 179.917,53.816 180.077,53.977 180.077,53.982 180.359,54.264 181.35,54.264 189.52,54.264 190.318,53.465 190.318,43.304 194.572,39.05 209.583,39.05 209.796,39.263 209.796,39.599 209.445,39.95 J29.E7@209.2,39.95
SLOT5.LVDS_4_P: IC4.N31 J29.D7 | length 105.4
  TopLayer w0.095: IC4.N31@155.061,48.95 v1(155.561,49.45)
  Layer 6 w0.08: v1(155.561,49.45) 155.987,49.876 160.536,49.876 161.903,51.243 169.628,51.243 169.815,51.243 170.096,51.525 170.096,53.319 170.257,53.48 170.578,53.48 170.738,53.319 170.738,51.343 171.02,51.061 171.513,51.061 171.794,51.343 171.794,54.577 171.955,54.738 172.276,54.738 172.436,54.577 172.436,51.343 172.718,51.061 173.211,51.061 173.492,51.343 173.492,54.577 173.653,54.738 173.974,54.738 174.134,54.577 174.134,51.343 174.416,51.061 174.909,51.061 175.19,51.343 175.19,54.577 175.351,54.738 175.672,54.738 175.832,54.577 175.832,51.343 176.114,51.061 176.607,51.061 176.888,51.343 176.888,54.577 177.049,54.738 177.37,54.738 177.53,54.577 177.53,51.343 177.812,51.061 178.305,51.061 178.586,51.343 178.586,54.577 178.747,54.738 179.068,54.738 179.228,54.577 179.228,53.891 179.51,53.609 180.003,53.609 180.284,53.891 180.284,53.897 180.445,54.057 181.35,54.057 189.434,54.057 190.111,53.38 190.111,43.218 194.487,38.843 209.669,38.843 210.003,39.177 210.003,39.599 210.354,39.95 J29.D7@210.6,39.95
SLOT5.LVDS_5_N: IC4.N33 J12.H5 | length 107.7
  TopLayer w0.095: IC4.N33@157.061,48.95 v1(157.561,49.45)
  Layer 3 w0.075: v1(157.561,49.45) 157.206,49.45 157.162,49.494 157.162,50.566 157.446,50.85 158.001,50.85 158.003,50.848 158.859,50.848 161.454,53.443 161.637,53.626 161.862,53.626 162.021,53.466 162.021,52.204 162.299,51.927 162.784,51.927 163.062,52.204 163.062,54.362 163.221,54.521 163.54,54.521 163.699,54.362 163.699,52.204 163.977,51.927 164.462,51.927 164.74,52.204 164.74,54.362 164.899,54.521 165.218,54.521 165.377,54.362 165.377,52.204 165.655,51.927 166.14,51.927 166.418,52.204 166.418,54.362 166.577,54.521 166.896,54.521 167.055,54.362 167.055,52.204 167.333,51.927 167.818,51.927 168.096,52.204 168.096,54.362 168.255,54.521 168.574,54.521 168.733,54.362 168.733,52.204 169.011,51.927 169.497,51.927 169.774,52.204 169.774,54.362 169.933,54.521 170.252,54.521 170.411,54.362 170.411,52.204 170.689,51.927 171.175,51.927 171.452,52.204 171.452,54.362 171.611,54.521 171.93,54.521 172.089,54.362 172.089,52.204 172.367,51.927 172.853,51.927 173.13,52.204 173.13,54.362 173.289,54.521 173.608,54.521 173.767,54.362 173.767,52.612 174.045,52.334 174.531,52.334 174.808,52.612 174.808,54.189 174.967,54.348 175.064,54.348 175.597,54.348 178.294,57.045 178.294,59.383 178.664,59.752 179.039,59.752 179.22,59.752 179.497,60.03 179.497,60.459 179.657,60.618 179.975,60.618 180.134,60.459 180.134,59.589 180.412,59.311 180.898,59.311 181.175,59.589 181.175,60.459 181.335,60.618 181.653,60.618 181.812,60.459 181.812,59.593 182.09,59.316 182.576,59.316 182.853,59.593 182.853,60.459 183.013,60.618 183.331,60.618 183.49,60.459 183.49,59.942 183.768,59.664 184.254,59.664 184.531,59.942 184.531,60.459 184.691,60.618 185.009,60.618 185.168,60.459 185.168,59.942 185.446,59.664 185.932,59.664 186.209,59.942 186.209,60.459 186.369,60.618 186.687,60.618 186.846,60.459 186.846,59.942 187.124,59.664 187.61,59.664 187.887,59.942 187.887,60.459 188.047,60.618 188.365,60.618 188.524,60.459 188.524,59.942 188.802,59.664 189.288,59.664 189.565,59.942 189.565,60.459 189.725,60.618 190.043,60.618 190.202,60.459 190.202,59.942 190.48,59.664 190.966,59.664 191.243,59.942 191.243,60.459 191.403,60.618 191.721,60.618 191.88,60.459 191.88,59.942 192.158,59.664 192.644,59.664 192.921,59.942 192.921,60.564 193.081,60.723 193.399,60.723 193.558,60.564 193.558,60.03 193.836,59.752 194.459,59.752 194.835,59.376 198.361,55.85 205.11,55.85 205.599,55.361 205.599,55.299 205.249,54.95 J12.H5@205,54.95
SLOT5.LVDS_5_P: IC4.N32 J12.G5 | length 108.3
  TopLayer w0.095: IC4.N32@156.061,48.95 v1(156.561,49.45)
  Layer 3 w0.075: v1(156.561,49.45) 156.916,49.45 156.96,49.494 156.96,50.65 157.362,51.052 158.085,51.052 158.087,51.05 158.775,51.05 161.454,53.729 161.553,53.828 161.945,53.828 162.223,53.55 162.223,52.288 162.382,52.129 162.701,52.129 162.86,52.288 162.86,54.445 163.138,54.723 163.623,54.723 163.901,54.445 163.901,52.288 164.06,52.129 164.379,52.129 164.538,52.288 164.538,54.445 164.816,54.723 165.301,54.723 165.579,54.445 165.579,52.288 165.738,52.129 166.057,52.129 166.216,52.288 166.216,54.445 166.494,54.723 166.979,54.723 167.257,54.445 167.257,52.288 167.416,52.129 167.735,52.129 167.894,52.288 167.894,54.445 168.172,54.723 168.657,54.723 168.935,54.445 168.935,52.288 169.094,52.129 169.413,52.129 169.572,52.288 169.572,54.445 169.85,54.723 170.336,54.723 170.613,54.445 170.613,52.288 170.772,52.129 171.091,52.129 171.25,52.288 171.25,54.445 171.528,54.723 172.014,54.723 172.291,54.445 172.291,52.288 172.45,52.129 172.769,52.129 172.928,52.288 172.928,54.445 173.206,54.723 173.692,54.723 173.969,54.445 173.969,52.696 174.128,52.536 174.447,52.536 174.606,52.696 174.606,54.272 174.884,54.55 175.064,54.55 175.514,54.55 178.092,57.129 178.092,59.466 178.58,59.954 179.039,59.954 179.136,59.954 179.295,60.113 179.295,60.542 179.573,60.82 180.059,60.82 180.336,60.542 180.336,59.672 180.496,59.513 180.814,59.513 180.973,59.672 180.973,60.542 181.251,60.82 181.737,60.82 182.014,60.542 182.014,59.677 182.174,59.518 182.492,59.518 182.651,59.677 182.651,60.542 182.929,60.82 183.415,60.82 183.692,60.542 183.692,60.025 183.852,59.866 184.17,59.866 184.329,60.025 184.329,60.542 184.607,60.82 185.093,60.82 185.37,60.542 185.37,60.025 185.53,59.866 185.848,59.866 186.007,60.025 186.007,60.542 186.285,60.82 186.771,60.82 187.048,60.542 187.048,60.025 187.208,59.866 187.526,59.866 187.685,60.025 187.685,60.542 187.963,60.82 188.449,60.82 188.726,60.542 188.726,60.025 188.886,59.866 189.204,59.866 189.363,60.025 189.363,60.542 189.641,60.82 190.127,60.82 190.404,60.542 190.404,60.025 190.564,59.866 190.882,59.866 191.041,60.025 191.041,60.542 191.319,60.82 191.805,60.82 192.082,60.542 192.082,60.025 192.242,59.866 192.56,59.866 192.719,60.025 192.719,60.647 192.997,60.925 193.483,60.925 193.76,60.647 193.76,60.113 193.92,59.954 194.543,59.954 194.835,59.662 198.445,56.052 205.194,56.052 205.801,55.445 205.801,55.299 206.15,54.95 J12.G5@206.4,54.95
SLOT5.LVDS_6_N: IC4.M34 J12.K5 | length 107.7
  TopLayer w0.095: IC4.M34@158.061,49.95 v1(158.561,50.45)
  Layer 3 w0.075: v1(158.561,50.45) 158.561,50.095 158.605,50.051 159.719,50.051 160.87,51.203 174.148,51.203 179.627,56.682 179.664,56.719 179.664,57.959 179.942,58.236 180.428,58.236 180.705,57.959 180.705,55.796 180.864,55.637 181.183,55.637 181.342,55.796 181.342,57.935 181.62,58.213 182.106,58.213 182.383,57.935 182.383,55.796 182.542,55.637 182.861,55.637 183.02,55.796 183.02,59.011 183.298,59.289 183.784,59.289 184.061,59.011 184.061,55.796 184.22,55.637 184.539,55.637 184.698,55.796 184.698,59.011 184.976,59.289 185.462,59.289 185.739,59.011 185.739,55.796 185.898,55.637 186.217,55.637 186.376,55.796 186.376,59.011 186.654,59.289 187.14,59.289 187.417,59.011 187.417,55.796 187.576,55.637 187.895,55.637 188.054,55.796 188.054,59.011 188.332,59.289 188.818,59.289 189.095,59.011 189.095,55.796 189.254,55.637 189.573,55.637 189.732,55.796 189.732,59.011 190.01,59.289 190.496,59.289 190.773,59.011 190.773,55.796 190.932,55.637 191.251,55.637 191.41,55.796 191.41,59.011 191.688,59.289 192.174,59.289 192.451,59.011 192.451,55.796 192.61,55.637 192.929,55.637 193.088,55.796 193.088,59.011 193.366,59.289 193.852,59.289 194.129,59.011 194.129,55.796 194.288,55.637 194.607,55.637 194.766,55.796 194.766,57.655 195.044,57.933 195.53,57.933 195.807,57.655 195.807,57.071 196.543,56.335 198.828,54.05 201.219,54.05 201.399,54.23 201.399,54.568 cw(c202.2,54.95) 201.374,54.626 201.049,54.95 J12.K5@200.8,54.95
SLOT5.LVDS_6_P: IC4.N34 J12.J5 | length 108.1
  TopLayer w0.095: IC4.N34@158.061,48.95 v1(158.561,49.45)
  Layer 3 w0.075: v1(158.561,49.45) 158.561,49.805 158.605,49.849 159.802,49.849 160.954,51.001 174.231,51.001 179.627,56.396 179.866,56.636 179.866,57.875 180.025,58.034 180.344,58.034 180.503,57.875 180.503,55.713 180.781,55.435 181.267,55.435 181.544,55.713 181.544,57.851 181.703,58.011 182.022,58.011 182.181,57.851 182.181,55.713 182.459,55.435 182.945,55.435 183.222,55.713 183.222,58.928 183.381,59.087 183.7,59.087 183.859,58.928 183.859,55.713 184.137,55.435 184.623,55.435 184.9,55.713 184.9,58.928 185.059,59.087 185.378,59.087 185.537,58.928 185.537,55.713 185.815,55.435 186.301,55.435 186.578,55.713 186.578,58.928 186.737,59.087 187.056,59.087 187.215,58.928 187.215,55.713 187.493,55.435 187.979,55.435 188.256,55.713 188.256,58.928 188.415,59.087 188.734,59.087 188.893,58.928 188.893,55.713 189.171,55.435 189.657,55.435 189.934,55.713 189.934,58.928 190.093,59.087 190.412,59.087 190.571,58.928 190.571,55.713 190.849,55.435 191.335,55.435 191.612,55.713 191.612,58.928 191.771,59.087 192.09,59.087 192.249,58.928 192.249,55.713 192.527,55.435 193.013,55.435 193.29,55.713 193.29,58.928 193.449,59.087 193.768,59.087 193.927,58.928 193.927,55.713 194.205,55.435 194.691,55.435 194.968,55.713 194.968,57.572 195.127,57.731 195.446,57.731 195.605,57.572 195.605,56.987 196.543,56.049 198.744,53.848 201.303,53.848 201.601,54.146 201.601,54.568 ccw(c200.8,54.95) 201.626,54.626 201.95,54.95 J12.J5@202.2,54.95
SLOT5.LVDS_7_N: IC4.N28 J12.C6 | length 118.4
  TopLayer w0.095: IC4.N28@152.061,48.95 v1(152.561,49.45) ; v1(166.847,56.432) 166.847,56.514 167.025,56.692 167.025,57.45 166.682,57.793 164.928,57.793 164.572,58.149 164.29,58.432 161.914,60.807 161.914,61.265 162.792,62.144 164.548,62.144 166.217,60.475 169.52,57.172 187.646,57.172 188.603,56.215 188.739,56.079 188.925,56.079 189.037,56.079 189.201,56.243 189.201,56.992 189.496,57.287 190.008,57.287 190.302,56.992 190.302,55.035 190.467,54.871 190.795,54.871 190.959,55.035 190.959,56.992 191.254,57.287 191.766,57.287 192.06,56.992 192.06,55.035 192.225,54.871 192.553,54.871 192.717,55.035 192.717,56.992 193.012,57.287 193.524,57.287 193.818,56.992 193.818,55.035 193.983,54.871 194.311,54.871 194.475,55.035 194.475,56.992 194.77,57.287 195.282,57.287 195.576,56.992 195.576,55.035 195.741,54.871 196.069,54.871 196.233,55.035 196.233,56.992 196.528,57.287 197.04,57.287 197.334,56.992 197.334,55.035 197.499,54.871 197.827,54.871 197.991,55.035 197.991,55.784 198.286,56.079 198.761,56.079 211.083,56.079 211.13,56.079 ccw(c211.13,56.201) 211.253,56.201 211.253,56.264 cw(c211.375,56.264) 211.375,56.387 cw(c211.375,56.264) 211.498,56.264 211.498,56.201 ccw(c211.62,56.201) 211.62,56.079 212,56.079 212.553,56.079 212.689,56.215 212.689,56.593 212.332,56.95 J12.C6@212.1,56.95
  Layer 6 w0.08: v1(152.561,49.45) 152.211,49.45 152.165,49.497 152.165,53.573 152.442,53.85 160.304,53.85 160.491,53.85 160.748,54.107 160.748,54.324 160.883,54.46 161.154,54.46 161.29,54.324 161.29,53.709 161.546,53.452 161.989,53.452 162.246,53.709 162.246,55.801 162.381,55.937 162.652,55.937 162.788,55.801 162.788,53.709 163.044,53.452 163.487,53.452 163.744,53.709 163.744,56.484 163.879,56.62 164.15,56.62 164.286,56.484 164.286,53.709 164.542,53.452 164.985,53.452 165.242,53.709 165.242,53.719 165.765,54.242 166.068,54.545 166.068,56.366 166.267,56.565 166.64,56.565 166.773,56.432 v1(166.847,56.432)
SLOT5.LVDS_7_P: IC4.N27 J12.B6 | length 119
  TopLayer w0.095: IC4.N27@151.061,48.95 v1(151.561,49.45) ; v1(167.411,56.477) 167.411,56.514 167.247,56.678 167.247,57.542 166.774,58.015 165.02,58.015 164.886,58.149 162.136,60.899 162.136,61.174 162.884,61.922 164.457,61.922 166.125,60.253 169.428,56.95 187.554,56.95 188.289,56.215 188.446,56.058 188.647,55.857 188.925,55.857 189.129,55.857 189.423,56.151 189.423,56.9 189.588,57.065 189.916,57.065 190.08,56.9 190.08,54.943 190.375,54.649 190.887,54.649 191.181,54.943 191.181,56.9 191.346,57.065 191.674,57.065 191.838,56.9 191.838,54.943 192.133,54.649 192.645,54.649 192.939,54.943 192.939,56.9 193.104,57.065 193.432,57.065 193.596,56.9 193.596,54.943 193.891,54.649 194.403,54.649 194.697,54.943 194.697,56.9 194.862,57.065 195.19,57.065 195.354,56.9 195.354,54.943 195.649,54.649 196.161,54.649 196.455,54.943 196.455,56.9 196.62,57.065 196.948,57.065 197.112,56.9 197.112,54.943 197.407,54.649 197.919,54.649 198.213,54.943 198.213,55.692 198.378,55.857 198.761,55.857 212.645,55.857 212.911,56.123 212.911,56.593 213.268,56.95 J12.B6@213.5,56.95
  Layer 6 w0.08: v1(151.561,49.45) 151.911,49.45 151.958,49.497 151.958,53.658 152.356,54.057 160.304,54.057 160.405,54.057 160.541,54.193 160.541,54.41 160.797,54.667 161.24,54.667 161.497,54.41 161.497,53.795 161.632,53.659 161.903,53.659 162.039,53.795 162.039,55.887 162.295,56.144 162.738,56.144 162.995,55.887 162.995,53.795 163.13,53.659 163.401,53.659 163.537,53.795 163.537,56.57 163.793,56.827 164.236,56.827 164.493,56.57 164.493,53.795 164.628,53.659 164.899,53.659 165.035,53.795 165.035,53.804 165.765,54.534 165.861,54.631 165.861,56.452 166.181,56.772 167.116,56.772 167.406,56.481 v1@167.406,56.477
SLOT5.LVDS_8_N: IC4.AH29 J12.F6 | length 108.7
  TopLayer w0.095: IC4.AH29@153.061,33.95 v1(153.561,33.45)
  layer 8 w0.075: v1(153.561,33.45) 153.206,33.45 153.162,33.406 153.162,33.066 152.944,32.848 147.362,32.848 147.303,32.907 146.959,33.251 146.959,48.734 147.275,49.05 179.287,49.05 180.418,50.181 180.418,53.474 181.268,54.324 184.594,54.324 189.421,59.151 189.983,59.151 190.08,59.151 190.264,59.336 190.264,61.181 190.566,61.483 191.102,61.483 191.405,61.181 191.405,59.201 191.589,59.017 191.958,59.017 192.142,59.201 192.142,61.53 192.444,61.833 192.98,61.833 193.283,61.53 193.283,59.201 193.467,59.017 193.836,59.017 194.02,59.201 194.02,61.53 194.322,61.833 194.858,61.833 195.161,61.53 195.161,59.336 195.345,59.151 195.536,59.151 197.103,59.151 197.424,58.83 197.496,58.759 197.849,58.406 197.849,56.962 198.761,56.05 208.286,56.05 208.499,56.263 208.499,56.601 208.149,56.95 J12.F6@207.9,56.95
SLOT5.LVDS_8_P: IC4.AH28 J12.E6 | length 108
  TopLayer w0.095: IC4.AH28@152.061,33.95 v1(152.561,33.45)
  layer 8 w0.075: v1(152.561,33.45) 152.916,33.45 152.96,33.406 152.96,33.15 152.86,33.05 147.446,33.05 147.161,33.335 147.161,48.65 147.359,48.848 179.371,48.848 180.62,50.097 180.62,53.39 181.352,54.122 184.678,54.122 189.505,58.949 189.983,58.949 190.163,58.949 190.466,59.252 190.466,61.097 190.65,61.281 191.019,61.281 191.203,61.097 191.203,59.117 191.505,58.815 192.041,58.815 192.344,59.117 192.344,61.446 192.528,61.631 192.897,61.631 193.081,61.446 193.081,59.117 193.383,58.815 193.919,58.815 194.222,59.117 194.222,61.446 194.406,61.631 194.775,61.631 194.959,61.446 194.959,59.252 195.261,58.949 195.536,58.949 197.019,58.949 197.647,58.322 197.647,56.879 198.677,55.848 208.37,55.848 208.701,56.179 208.701,56.601 209.05,56.95 J12.E6@209.3,56.95
SLOT5.LVDS_9_N: IC4.AH31 J12.I6 | length 116.1
  TopLayer w0.095: IC4.AH31@155.061,33.95 v1(155.561,33.45)
  Layer 5 w0.08: v1(168.209,34.464) 168.209,34.511 168.369,34.671 168.369,34.842 168.644,35.117 169.236,35.117 169.528,35.41 169.528,36.69 168.385,37.833 168.385,39.162 174.273,45.05 176.068,45.05 187.068,56.05 203.814,56.05 204.296,56.533 204.296,56.599 203.945,56.95 J12.I6@203.7,56.95
  BottomLayer w0.095: v1(155.561,33.45) 155.561,33.783 155.617,33.839 159.464,33.839 160.108,34.483 160.718,35.093 161.021,35.093 161.235,34.878 161.235,26.64 161.579,26.295 162.192,26.295 162.536,26.64 162.536,34.955 162.75,35.169 163.179,35.169 163.393,34.955 163.393,26.64 163.737,26.295 164.35,26.295 164.694,26.64 164.694,34.955 164.908,35.169 165.337,35.169 165.551,34.955 165.551,26.64 165.895,26.295 166.508,26.295 166.852,26.64 166.852,34.914 167.066,35.128 167.189,35.128 167.934,35.128 168.361,34.701 168.361,34.45 168.222,34.45 v1(168.209,34.464)
SLOT5.LVDS_9_P: IC4.AG31 J12.H6 | length 116.5
  TopLayer w0.095: IC4.AG31@155.061,34.95 v1(155.561,34.45)
  Layer 5 w0.08: v1(168.736,34.464) 168.736,34.511 168.576,34.671 168.576,34.757 168.729,34.91 169.321,34.91 169.735,35.324 169.735,36.776 168.592,37.919 168.592,39.076 174.359,44.843 176.154,44.843 187.154,55.843 203.899,55.843 204.503,56.447 204.503,56.599 204.854,56.95 J12.H6@205.1,56.95
  BottomLayer w0.095: v1(155.561,34.45) 155.561,34.117 155.617,34.061 159.372,34.061 160.108,34.797 160.626,35.315 161.113,35.315 161.457,34.97 161.457,26.732 161.671,26.517 162.1,26.517 162.314,26.732 162.314,35.047 162.658,35.391 163.271,35.391 163.615,35.047 163.615,26.732 163.829,26.517 164.258,26.517 164.472,26.732 164.472,35.047 164.816,35.391 165.429,35.391 165.773,35.047 165.773,26.732 165.987,26.517 166.416,26.517 166.63,26.732 166.63,35.006 166.974,35.35 167.189,35.35 168.026,35.35 168.583,34.793 168.583,34.45 168.722,34.45 v1(168.736,34.464)